# Altium PCB PCB_Flex_USB_v2.4.PcbDoc
Units mil, origin at the board's own origin, x right, y up, seen from the top; angles counter-clockwise.
Board outline 354.33 x 2205.24 mil, 2 copper layers (Top Layer, Bottom Layer), stack 3.756 mil thick; 10 components, 4 nets, 8 pads, 0 vias.
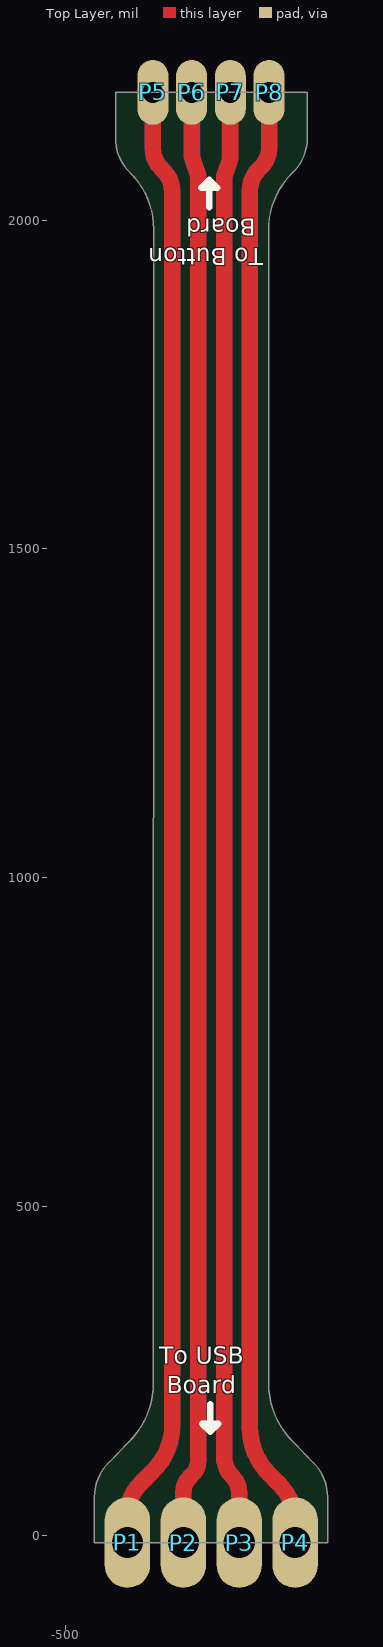
[diagram p0: Top Layer view]
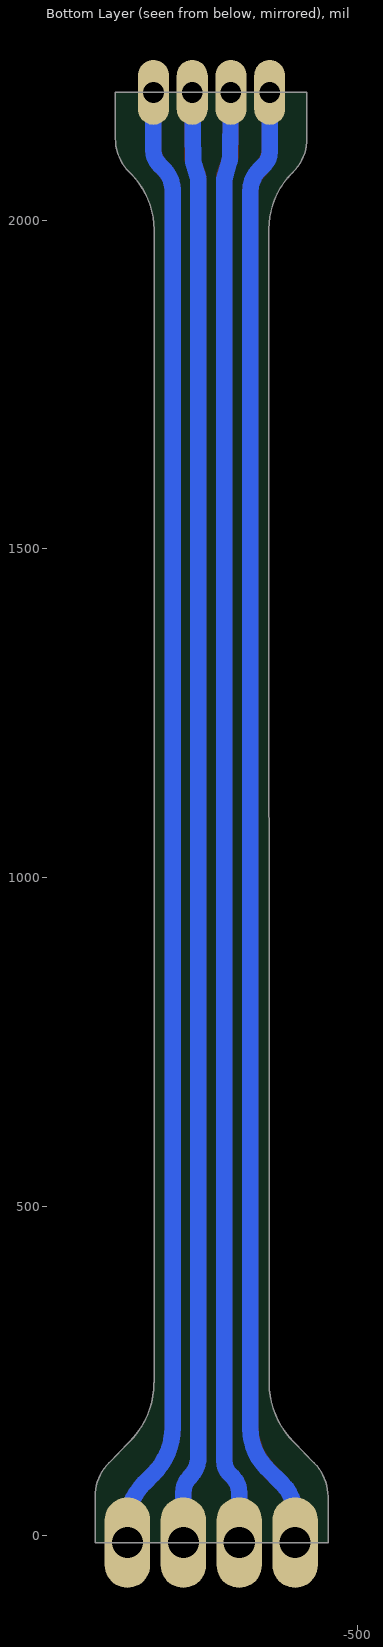
[diagram p1: Bottom Layer view, seen from below]

## Layer stack, top to bottom
Top Solder: solder mask 0.5, Solder Resist, Dk 3.5
Top Layer: signal copper 1.378
Dielectric 1: core 1, Polyimide, Dk 3.5
Bottom Layer: signal copper 1.378
Bottom Solder: solder mask 0.5, Solder Resist, Dk 3.5

## Board outline
-455.61,-11.02 -455.61,58.98 cw(c-383.18,58.98) -434.4,110.19 -403.41,141.84 ccw(c-493.46,231.89) -366.11,231.89 -365.58,1951.3 -365.57,1951.3 -365.57,1986.22 ccw(c-486.28,1986.22) -400.92,2071.57 -402.36,2073.01 cw(c-351.14,2124.22) -423.57,2124.22 -423.57,2194.22 -132.23,2194.22 -132.23,2124.22 cw(c-204.66,2124.22) -153.45,2073.01 -155.62,2070.83 ccw(c-70.27,1985.47) -190.98,1985.47 -190.98,1956.69 -190.98,231.89 -190.78,231.89 ccw(c-63.43,231.89) -153.48,141.84 -122.49,110.19 cw(c-173.71,58.98) -101.28,58.98 -101.28,-11.02

## Design rules (kind name [scope] priority, off if disabled: settings)
Clearance [All] p1: gap=10 ignorepadtopadclearanceinfootprint=FALSE except(0: Arc-Hole Track-Hole SMDPad-Hole THPad-Hole Via-Hole Fill-Hole Poly-Hole Region-Hole Text-Hole)
ComponentClearance [All] p1: gap=0 collisioncheckmode=3 verticalgap=0 showdistances=FALSE
HoleToHoleClearance [All] p1: gap=0 allowstackedmicrovias=TRUE
MinimumSolderMaskSliver [All] p1: minsoldermaskwidth=0
PolygonConnect [All] p1: connectstyle=Relief reliefconductorwidth=10 reliefentries=4 polygonreliefangle="90 Angle" airgapwidth=10
RoutingVias [All] p1: holewidth=11.81 width=23.62 viastyle="Through Hole" minholewidth=11.81 minwidth=23.62 maxholewidth=11.81 maxwidth=23.62
SilkToSilkClearance [All] p1: silktosilkclearance=0
SilkToSolderMaskClearance [IsPad] p1: minsilkscreentomaskgap=0 clearancetoexposedcopper=TRUE
SolderMaskExpansion [All] p1: expansion=4 istentingtop=FALSE
Width [All] p1: maxlimit=25 minlimit=10 preferedwidth=10 minimp=50.000000 maximp=50.000000 favimp=50.000000
25 further rules are at their usual default settings.

## Classes and differential pairs
component class Flex-USB: P1 P2 P7 P8

## Components (designator, comment, footprint, x,y, rotation, side; value= is the part's Value field where it differs from the comment)
P1 "0.5mm Test Pad" "0.5mm Test Pad"#1 -405.61,-11.02 r270 top
P2 "0.5mm Test Pad" "0.5mm Test Pad"#1 -320.56,-11.02 r270 top
P3 "0.5mm Test Pad" "0.5mm Test Pad"#2 -235.52,-11.02 r180 top
P4 "0.5mm Test Pad" "0.5mm Test Pad"#3 -20,-260 r180 top
P5 "0.5mm Test Pad" "0.5mm Test Pad"#4 -366.86,2194.22 r180 top
P6 "0.5mm Test Pad" "0.5mm Test Pad"#4 -307.87,2194.22 r0 top
P7 "0.5mm Test Pad" "0.5mm Test Pad"#5 -307.87,2194.22 r180 top
P8 "0.5mm Test Pad" "0.5mm Test Pad"#4 -190.1,2194.22 r180 top
P9 "0.5mm Test Pad" "0.5mm Test Pad"#6 -814.41,105.35 r180 top (schematic designator P4)
P10 "0.5mm Test Pad" "0.5mm Test Pad"#6 -1444.33,538.42 r180 top (schematic designator P4)

## Footprints (in the part's own frame and the unit in brackets; to place one, negate y for a bottom-side part, rotate by r counter-clockwise, add the part's x,y. Pads: shape width x height; smd on the part's side, far side on the other; paste and mask are expansions set on the pad)
"0.5mm Test Pad"#1 [mm]
  oval 3.5x1.75 hole 1.2: 1(0,0)
"0.5mm Test Pad"#2 [mm]
  oval 1.75x3.5 hole 1.2: 1(0,0)
"0.5mm Test Pad"#3 [mm]
  oval 1.75x3.5 hole 1.2: 1(3.314,-6.324)
"0.5mm Test Pad"#4 [mm]
  oval 1.2x2.5 hole 0.8: 1(0,0)
"0.5mm Test Pad"#5 [mm]
  oval 1.2x2.5 hole 0.8: 1(-1.493,0)
"0.5mm Test Pad"#6 [mm]

## Part data
P1 P2 P3 P4 P5 P6 P7 P8 P9 P10: "Test pad"

## Nets (pads, with @x,y where several pads share a name; then routed paths per layer and width w, separated by ;. In a path a pad name is that pad's centre, name@x,y a point inside that pad or via, vN(x,y) a via of type N, cw(c..) or ccw(c..) an arc to the next point about the centre after c; other vN are vias at no path point)
NetP1_1: P1.1 P5.1 | length 4421.4
  Top Layer w25: P1.1 -405.61,30.69 cw(c-337.33,30.69) -385.61,78.98 -366.6,97.98 ccw(c-437.31,168.69) -337.31,168.69 -337.31,180.53 ; P5.1 -366.86,2110.26 ccw(c-320.83,2110.26) -353.38,2077.71 -350.16,2074.49 cw(c-381.16,2043.48) -337.31,2043.48 -337.31,2039.49 -337.31,2004.4 ; -337.32,180 -337.32,2000.11
  Bottom Layer w25: P1.1@-405.61,30.69 cw(c-337.33,30.69) -385.61,78.98 -362.45,102.14 ccw(c-423.03,162.78) -337.31,162.78 -337.31,2039.48 ; P5.1 -366.86,2103.34 ccw(c-340.65,2103.34) -359.18,2084.81 -351.2,2076.83 cw(c-384.74,2043.29) -337.31,2043.29
NetP2_1: P2.1 P6.1 | length 4426.7
  Top Layer w25: P2.1 -320.56,64.62 cw(c-286.11,64.62) -310.47,88.98 -305.8,93.65 ccw(c-324.78,112.62) -297.94,112.62 -297.94,2067.97 -306.47,2092.37 ; P6.1 -307.87,2100.61 ccw(c-282.87,2100.61) -306.48,2092.4
  Bottom Layer w25: P2.1 -320.56,64.62 cw(c-286.11,64.62) -310.47,88.98 -305.8,93.65 ccw(c-324.78,112.62) -297.94,112.62 -297.94,2063.01 -305.53,2089.13 -305.55,2089.19 cw(c-281.52,2096.11) -306.52,2095.65 -307.87,2168.63 P6.1
NetP3_1: P3.1 P7.1 | length 4497.3
  Top Layer w25: P7.1 P7.1@-249.09,2168.63 ; P3.1 -235.52,64.62 ccw(c-269.97,64.62) -245.61,88.98 cw(c-214.31,120.27) -258.57,120.27 -258.6,2067 -250.67,2088.17 -250.65,2088.22 ccw(c-274.09,2096.92) -249.09,2096.92 ; -249.09,2096.92 P7.1@-249.09,2168.63 ; -249.09,2096.92 P7.1@-249.09,2168.63
  Bottom Layer w25: P7.1 -249.09,2168.63 -250.61,2091.62 cw(c-275.6,2092.11) -251.69,2084.81 -258.57,2062.28 -258.57,2047.61 -258.57,180.53 -258.57,120.27 ccw(c-214.31,120.27) -245.61,88.98 cw(c-269.97,64.62) -235.52,64.62 P3.1
NetP4_1: P4.1 P8.1 | length 4433.8
  Top Layer w25: -206.36,2076.38 ccw(c-175.36,2045.38) -219.2,2045.38 -219.2,163.99 ccw(c-119.2,163.99) -189.91,93.28 -175.61,78.98 cw(c-236.29,18.29) -150.47,18.29 P4.1 ; -203.14,2079.61 ccw(c-235.69,2112.15) -189.66,2112.15 P8.1@-189.66,2193.16
  Bottom Layer w25: P8.1 -190.1,2105.49 cw(c-219.34,2105.49) -198.66,2084.81 -206.11,2077.36 ccw(c-174.49,2045.75) -219.2,2045.75 -219.2,163.99 ccw(c-119.2,163.99) -189.91,93.28 -175.61,78.98 cw(c-236.29,18.29) P4.1@-150.47,18.29

## Silkscreen, mask and mechanical layers (free items; w line width, h text height)
Top Overlay:
  lines w10: -280.98,2019.58 -280.98,2061.3 ; -279.67,199.25 -279.67,157.53 ; -280.98,2061.3 -268.98,2049.3 -292.98,2049.3 -280.98,2061.3 ; -279.67,157.53 -291.67,169.53 -267.67,169.53 -279.67,157.53
  text "To Button /  Board" at -198.69,2011.43 h45 r180
  text "To USB /  Board" at -356.88,207.19 h45
Board Outline:
  the board outline again, w10
Fabrication info:
  drawing of 193 lines, arcs and shapes, not listed
  text "Layer" at 2351.81,2178.3 h60
  text "Name" at 2761.72,2178.3 h60
  text "Material" at 3691.47,2178.3 h60
  text "Thickness" at 4551.24,2178.3 h60
  text "Constant" at 5201.07,2178.3 h60
  text "Board Layer Stack" at 5770.93,2178.3 h60
  text "Stiffener Area: 4.5mm" at 115.72,2082.3 h60
  text "Top Overlay" at 2761.72,2058.3 h60
  text "Top Solder" at 2761.72,1938.3 h60
  text "Solder Resist" at 3691.47,1938.3 h60
  text "0.50mil" at 4551.24,1938.3 h60
  text "3.5" at 5201.07,1938.3 h60
  text "1" at 2351.81,1818.3 h60
  text "Top Layer" at 2761.72,1818.3 h60
  text "1.38mil" at 4551.24,1818.3 h60
  text "Dielectric 1" at 2761.72,1698.3 h60
  text "Polyimide" at 3691.47,1698.3 h60
  text "1.00mil" at 4551.24,1698.3 h60
  text "3.5" at 5201.07,1698.3 h60
  text "2" at 2351.81,1578.3 h60
  text "Bottom Layer" at 2761.72,1578.3 h60
  text "1.38mil" at 4551.24,1578.3 h60
  text "Bottom Solder" at 2761.72,1458.3 h60
  text "Solder Resist" at 3691.47,1458.3 h60
  text "0.50mil" at 4551.24,1458.3 h60
  text "3.5" at 5201.07,1458.3 h60
  text "Note:" at 58.72,1435.3 h60
  text "Bottom Overlay" at 2761.72,1338.3 h60
  text "Stiffener Material: Polyimide" at 52.72,1320.29 h60
  text "Stiffener Thickness: 0.225 mm" at 53.99,1224.31 h60
  text "Total board thickness:" at 2351.81,1218.3 h60
  text "4.76mil" at 4551.24,1218.3 h60
  text "Stiffener side: Bottom side of PCB" at 53.04,1138.31 h60
  text "Total Thickness of PCB (0.3mm): Stiffener thickness + Layer Stackup thickness." at -24.34,711.27 h60
  text "Stiffener Area: 4.5mm" at 159.72,29.3 h60
Drill Drawing:
  circle w10: c-135.61,2676.59 r33.33
  lines w10: -168.94,2859.93 -102.28,2859.93 -135.61,2793.26 -168.94,2859.93
  lines w15: -228.73,2598.26 9204.66,2598.26 ; -228.73,2898.26 9204.66,2898.26 ; 322.14,2448.26 322.14,3048.26 ; 802.02,2448.26 802.02,3048.26 ; 1891.71,2448.26 1891.71,3048.26 ; 2397.58,2448.26 2397.58,3048.26 ; 3131.38,2448.26 3131.38,3048.26 ; 4630.93,2448.26 4630.93,3048.26 ; 5220.78,2448.26 5220.78,3048.26 ; 5966.58,2448.26 5966.58,3048.26 ; 6936.3,2448.26 6936.3,3048.26 ; 7802.06,2448.26 7802.06,3048.26 ; -228.73,2448.26 9204.66,2448.26 9204.66,3048.26 -228.73,3048.26 -228.73,2448.26
  text "Symbol" at -138.73,2943.26 h72
  text "Count" at 367.14,2943.26 h72
  text "Hole Size" at 847.02,2943.26 h72
  text "Plated" at 1936.71,2943.26 h72
  text "Hole Type" at 2442.58,2943.26 h72
  text "Drill Layer Pair" at 3176.38,2943.26 h72
  text "Via/Pad" at 4675.93,2943.26 h72
  text "Pad Shape" at 5265.78,2943.26 h72
  text "Template" at 6011.58,2943.26 h72
  text "Hole Length" at 6981.3,2943.26 h72
  text "Routed Path Length" at 7847.06,2943.26 h72
  text "4" at 367.14,2793.26 h60
  text "31.50mil (0.800mm)" at 847.02,2793.26 h60
  text "PTH" at 1936.71,2793.26 h60
  text "Round" at 2442.58,2793.26 h60
  text "Top Layer - Bottom Layer" at 3176.38,2793.26 h60
  text "Pad" at 4675.93,2793.26 h60
  text "Rounded" at 5265.78,2793.26 h60
  text "(Mixed)" at 6011.58,2793.26 h60
  text "-" at 6981.3,2793.26 h60
  text "-" at 7847.06,2793.26 h60
  text "4" at 367.14,2643.26 h60
  text "47.24mil (1.200mm)" at 847.02,2643.26 h60
  text "PTH" at 1936.71,2643.26 h60
  text "Round" at 2442.58,2643.26 h60
  text "Top Layer - Bottom Layer" at 3176.38,2643.26 h60
  text "Pad" at 4675.93,2643.26 h60
  text "Rounded" at 5265.78,2643.26 h60
  text "r350_175h120r88" at 6011.58,2643.26 h60
  text "-" at 6981.3,2643.26 h60
  text "-" at 7847.06,2643.26 h60
  text "8 Total" at 367.14,2493.26 h60

## Dimensions
-455.61,-11.02 to -423.57,2194.22 on Dimension